# Altium PCB Grantv3.PcbDoc (part 3 of 5)
Units mil, origin at the board's own origin, x right, y up, seen from the top; angles counter-clockwise.
Board outline 3031.03 x 2829.03 mil, 2 copper layers (Top Layer, Bottom Layer); 187 components, 111 nets, 634 pads, 178 vias.
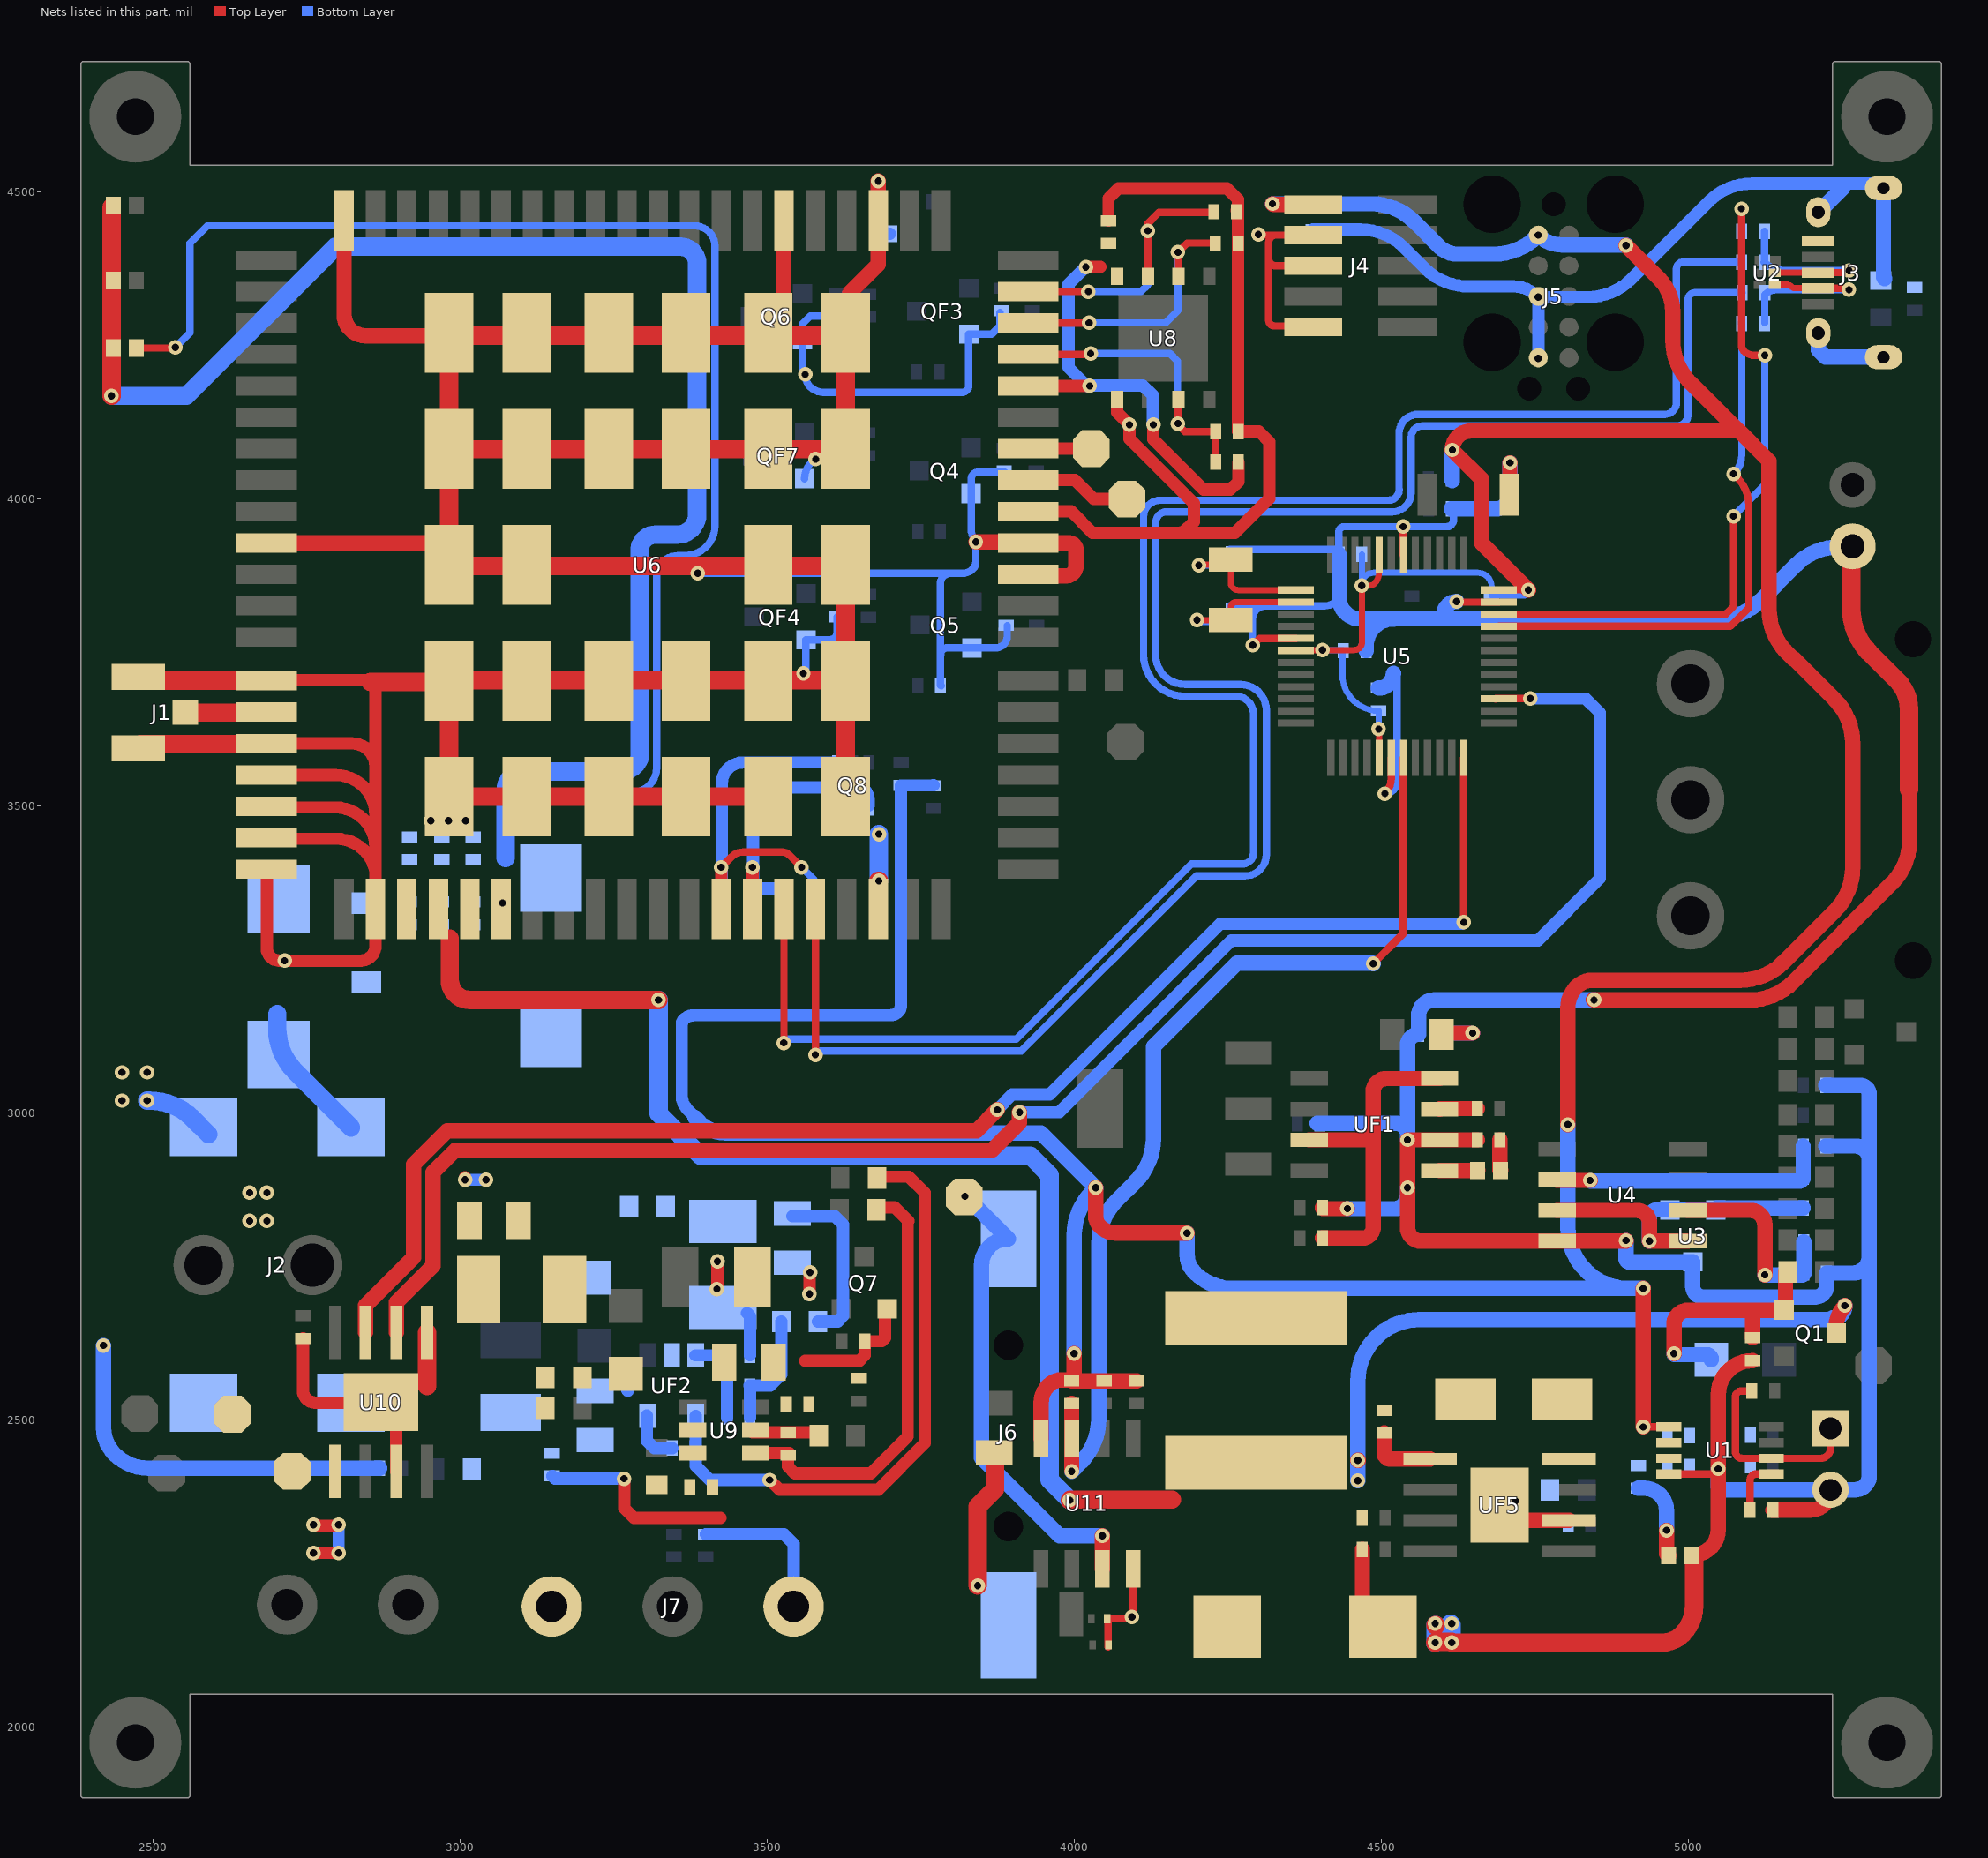
[diagram p2: the nets of this part, all layers, seen from the top]

## Part data (continued)
R28: library part RK73H1ETTP4992F, "RES 49.9K OHM 1% 1/10W 0402", Case/Package=0402, Case Code (Metric)=1005, MANUFACTURER="KOA Speer", Max Operating Temperature=155°C, Min Operating Temperature=-55°C, Package Quantity=10000, Power Rating=63mW, Resistance=49.9kR, Supplier Part Number 1=2019-RK73H1ETTP4992FCT-ND, Temperature Coefficient=100ppm/°C, Tolerance=1%, Voltage Rating=50V, Case Code (Imperial)=0402, ComponentLink1Description=http://www.jameco.com/Jameco/Products/ProdDS/1883861.pdf?src-supplier=Jameco, ComponentLink1URL=http://www.jameco.com/Jameco/Products/ProdDS/1883861.pdf?src-supplier=Jameco, ComponentLink2Description=http://components.arrow.com/part/dataview/39721535S7077293N5146?src-supplier=Arrow, ComponentLink2URL=http://components.arrow.com/part/dataview/39721535S7077293N5146?src-supplier=Arrow, ComponentLink3Description=http://www.koaspeer.com/catimages/Products/RK73H/RK73H.pdf?src-supplier=Mouser, ComponentLink3URL=http://www.koaspeer.com/catimages/Products/RK73H/RK73H.pdf?src-supplier=Mouser, Composition="Thick Film", Depth=0.5mm, Height=0.35mm, Lead Free="Lead Free", Length=1mm, Manufacturer Part Number=RK73H1ETTP4992F, Military Standard=Not, Packaging="Tape and Reel", Pricing 1="1=0.1, 10=0.024, 100=0.0097, 1000=0.00437, 2500=0.0038, 5000=0.00314 (USD)", Stock 1=158829, Supplier 1=Digi-Key, Termination=SMD/SMT, Voltage Rating (DC)=50V, Width=0.5mm, Working Voltage=50V
R101 RP4: library part RTT024022FTH, "40.2K ±1% 1/16W ±100ppm/°C 0402 Chip Resistor - Surface Mount RoHS", MANUFACTURER=RALEC, Package=0402, Manufacturer Part No=RTT024022FTH
RF1: library part 0805W4F680MT5E, "0.068 ±1% 1/4W ±800ppm/°C 0805 Chip Resistor - Surface Mount RoHS", MANUFACTURER="UNI-ROYAL(Uniroyal Elec)", Package=0805, Manufacturer Part No=0805W4F680MT5E
RF2: library part ERJ-2GEJ102X, "RES SMD 1K OHM 5% 1/10W 0402", Case/Package=0402, Case Code (Metric)=1005, MANUFACTURER=Panasonic, Max Operating Temperature=155°C, Max Power Dissipation=100mW, Min Operating Temperature=-55°C, Package Quantity=1, Resistance=1kR, Supplier Part Number 1=P1.0KJCT-ND, Temperature Coefficient=200ppm/°C, Tolerance=5%, Voltage Rating=50V, Case Code (Imperial)=0402, ComponentLink1Description=https://industrial.panasonic.com/cdbs/www-data/pdf/RDA0000/AOA0000C301.pdf?src-supplier=Future+Electronics, ComponentLink1URL=https://industrial.panasonic.com/cdbs/www-data/pdf/RDA0000/AOA0000C301.pdf?src-supplier=Future+Electronics, ComponentLink2Description=http://www.jameco.com/Jameco/Products/ProdDS/1986781.pdf?src-supplier=Jameco, ComponentLink2URL=http://www.jameco.com/Jameco/Products/ProdDS/1986781.pdf?src-supplier=Jameco, ComponentLink3Description=http://www.farnell.com/datasheets/2059623.pdf?src-supplier=Farnell, ComponentLink3URL=http://www.farnell.com/datasheets/2059623.pdf?src-supplier=Farnell, ComponentLink4Description=http://industrial.panasonic.com/www-data/pdf/AOA0000/AOA0000CE1.pdf?src-supplier=Avnet, ComponentLink4URL=http://industrial.panasonic.com/www-data/pdf/AOA0000/AOA0000CE1.pdf?src-supplier=Avnet, ComponentLink5Description=http://www.alliedelec.com/m/d/51cd0790071e1666bdb9d00c57fcf960.pdf?src-supplier=Allied+Electronics, ComponentLink5URL=http://www.alliedelec.com/m/d/51cd0790071e1666bdb9d00c57fcf960.pdf?src-supplier=Allied+Electronics, ComponentLink6Description=http://industrial.panasonic.com/www-data/pdf/AOA0000/AOA0000CE1.pdf?src-supplier=Avnet+Europe, ComponentLink6URL=http://industrial.panasonic.com/www-data/pdf/AOA0000/AOA0000CE1.pdf?src-supplier=Avnet+Europe, ComponentLink7Description=http://www.farnell.com/datasheets/2059623.pdf?src-supplier=Element14, ComponentLink7URL=http://www.farnell.com/datasheets/2059623.pdf?src-supplier=Element14, ComponentLink8Description=http://industrial.panasonic.com/cdbs/www-data/pdf/RDA0000/AOA0000C301.pdf?src-supplier=Farnell, ComponentLink8URL=http://industrial.panasonic.com/cdbs/www-data/pdf/RDA0000/AOA0000C301.pdf?src-supplier=Farnell, ComponentLink9Description=http://industrial.panasonic.com/www-data/pdf/AOA0000/AOA0000CE1.pdf?src-supplier=Avnet+Asia, ComponentLink9URL=http://industrial.panasonic.com/www-data/pdf/AOA0000/AOA0000CE1.pdf?src-supplier=Avnet+Asia, Composition="Thick Film", Contact Plating=Tin, Depth=0.5mm, Features="Automotive AEC-Q200", Height=0.35mm, Lead Free="Lead Free", Length=1mm, Manufacturer Part Number=ERJ-2GEJ102X, Military Standard=Not, Mount="Surface Mount", Number of Terminations=2, Packaging="Tape and Reel", Power Rating=100mW, Pricing 1="1=0.1, 10=0.032, 100=0.0129, 1000=0.00578, 2500=0.00502, 5000=0.00414 (USD)", Radiation Hardening=No, REACH SVHC="No SVHC", Stock 1=3855795, Supplier 1=Digi-Key, Termination=SMD/SMT, Voltage Rating (DC)=50V, Width=0.02inch, Working Voltage=50V
RF3 RF4: library part RC0402FR-071ML, "RES SMD 1M OHM 1% 1/16W 0402", Case/Package=0402, Case Code (Metric)=1005, MANUFACTURER=Yageo, Max Operating Temperature=155°C, Min Operating Temperature=-55°C, Power Rating=63mW, Resistance=1MR, Supplier Part Number 1=311-1.00MLRCT-ND, Temperature Coefficient=100ppm/°C, Tolerance=1%, Voltage Rating=50V, Case Code (Imperial)=0402, ComponentLink1Description=http://www.farnell.com/datasheets/1018594.pdf?src-supplier=Element14, ComponentLink1URL=http://www.farnell.com/datasheets/1018594.pdf?src-supplier=Element14, ComponentLink2Description=http://www.yageo.com/documents/recent/PYu-RC0402_51_RoHS_L_6_r.pdf?src-supplier=Future+Electronics, ComponentLink2URL=http://www.yageo.com/documents/recent/PYu-RC0402_51_RoHS_L_6_r.pdf?src-supplier=Future+Electronics, ComponentLink3Description=http://www.farnell.com/datasheets/2167052.pdf?src-supplier=Element14, ComponentLink3URL=http://www.farnell.com/datasheets/2167052.pdf?src-supplier=Element14, Composition="Thick Film", Depth=0.5mm, Height=0.32mm, Lead Free="Lead Free", Length=1mm, Manufacturer Part Number=RC0402FR-071ML, Military Standard=Not, Packaging="Tape and Reel", Pricing 1="1=0.1, 10=0.016, 100=0.0064, 1000=0.00289, 2500=0.00251, 5000=0.00207 (USD)", REACH SVHC=Unknown, Stock 1=3330803, Supplier 1=Digi-Key, Termination=SMD/SMT
RF16: library part RC0402FR-0713K3L, "RES SMD 13.3K OHM 1% 1/16W 0402", Case/Package=0402, Case Code (Metric)=1005, MANUFACTURER=Yageo, Max Operating Temperature=155°C, Max Power Dissipation=63mW, Min Operating Temperature=-55°C, Power Rating=62.5mW, Resistance=13.3kR, Supplier Part Number 1=YAG2974CT-ND, Temperature Coefficient=100ppm/°C, Tolerance=1%, Voltage Rating=50V, Case Code (Imperial)=0402, ComponentLink1Description=http://www.yageo.com/documents/recent/PYu-RC0402_51_RoHS_L_6.pdf?src-supplier=Avnet+Europe, ComponentLink1URL=http://www.yageo.com/documents/recent/PYu-RC0402_51_RoHS_L_6.pdf?src-supplier=Avnet+Europe, ComponentLink2Description=http://www.yageo.com/documents/recent/PYu-RC0402_51_RoHS_L_6_r.pdf?src-supplier=Future+Electronics, ComponentLink2URL=http://www.yageo.com/documents/recent/PYu-RC0402_51_RoHS_L_6_r.pdf?src-supplier=Future+Electronics, ComponentLink3Description=http://www.mouser.com/ds/2/447/PYu-RC0402_51_RoHS_L_6_r-8721.pdf?src-supplier=Mouser, ComponentLink3URL=http://www.mouser.com/ds/2/447/PYu-RC0402_51_RoHS_L_6_r-8721.pdf?src-supplier=Mouser, Composition="Thick Film", Contact Plating=Tin,Matte, Depth=0.5mm, Features="Moisture Resistant", Height=0.016inch, Lead Free="Lead Free", Length=1mm, Manufacturer Part Number=RC0402FR-0713K3L, Military Standard=Not, Number of Terminations=2, Packaging="Tape and Reel", Pricing 1="1=0.1, 10=0.016, 100=0.0064, 1000=0.00289, 2500=0.00251, 5000=0.00207 (USD)", Stock 1=459115, Supplier 1=Digi-Key, Termination=SMD/SMT, Voltage Rating (DC)=50V, Width=0.02inch, Working Voltage=50V
RF21 RF22 RF23 RF24: library part RC0402JR-070RL, "RES SMD 0 OHM JUMPER 1/16W 0402", Case/Package=0402, Case Code (Metric)=1005, MANUFACTURER=Yageo, Manufacturer Part Number=RC0402FR-070RL, Max Operating Temperature=155°C, Min Operating Temperature=-55°C, Power Rating=62.5mW, Resistance=0mR, Supplier Part Number 1=311-0.0LRCT-ND, Temperature Coefficient=200ppm/°C, Tolerance=1%, Voltage Rating=50V, Case Code (Imperial)=0402, ComponentLink1Description=http://www.yageo.com/documents/recent/PYu-RC0402_51_RoHS_L_6.pdf?src-supplier=Avnet, ComponentLink1URL=http://www.yageo.com/documents/recent/PYu-RC0402_51_RoHS_L_6.pdf?src-supplier=Avnet, ComponentLink2Description=http://www.yageo.com/documents/recent/PYu-RC0402_51_RoHS_L_6_r.pdf?src-supplier=Future+Electronics, ComponentLink2URL=http://www.yageo.com/documents/recent/PYu-RC0402_51_RoHS_L_6_r.pdf?src-supplier=Future+Electronics, ComponentLink3Description=http://www.yageo.com/documents/recent/PYu-RC0402_51_RoHS_L_6.pdf?src-supplier=Avnet+Europe, ComponentLink3URL=http://www.yageo.com/documents/recent/PYu-RC0402_51_RoHS_L_6.pdf?src-supplier=Avnet+Europe, Composition="Thick Film", Contact Plating=Tin,Matte, Height=0.35mm, Lead Free="Lead Free", Length=1mm, Mount="Surface Mount", Packaging="Tape and Reel", Pricing 1="1=0.1, 10=0.013, 25=0.0092, 50=0.0072, 100=0.0053, 250=0.004, 500=0.0032, 1000=0.00236, 5000=0.00169 (USD)", Radiation Hardening=No, Stock 1=3681314, Supplier 1=Digi-Key, Termination=SMD/SMT, Width=0.5mm
RF31: library part AC0402FR-07118KL, "RES SMD 118K OHM 1% 1/16W 0402", Case/Package=0402, MANUFACTURER=Yageo, Max Operating Temperature=155°C, Max Power Dissipation=63mW, Min Operating Temperature=-55°C, Resistance=118kR, Supplier Part Number 1=AC0402FR-07118KL-ND, Temperature Coefficient=100ppm/°C, Tolerance=1%, ComponentLink1Description=http://www.yageo.com/NewPortal/yageodocoutput?fileName=/pdf/R-Chip/PYu-AC_51_RoHS_L_6.pdf&src-supplier=Digi-Key, ComponentLink1URL=http://www.yageo.com/NewPortal/yageodocoutput?fileName=/pdf/R-Chip/PYu-AC_51_RoHS_L_6.pdf&src-supplier=Digi-Key, Composition="Thick Film", Features="Moisture Resistant,Automotive AEC-Q200", Height=0.015inch, Length=0.039inch, Manufacturer Part Number=AC0402FR-07118KL, Number of Terminations=2, Packaging="Tape and Reel", Pricing 1="10000=0.0022 (USD)", Stock 1=0, Supplier 1=Digi-Key, Width=0.02inch
RP1: library part RC0402FR-0760K4L, "RES SMD 60.4K OHM 1% 1/16W 0402", Case/Package=0402, Case Code (Metric)=1005, MANUFACTURER=Yageo, Max Operating Temperature=155°C, Min Operating Temperature=-55°C, Power Rating=62.5mW, Resistance=60.4kR, Supplier Part Number 1=311-60.4KLRCT-ND, Temperature Coefficient=100ppm/°C, Tolerance=1%, Voltage Rating=50V, Case Code (Imperial)=0402, ComponentLink1Description=http://www.yageo.com/documents/recent/PYu-RC0402_51_RoHS_L_6_r.pdf?src-supplier=Future+Electronics, ComponentLink1URL=http://www.yageo.com/documents/recent/PYu-RC0402_51_RoHS_L_6_r.pdf?src-supplier=Future+Electronics, ComponentLink2Description=http://www.yageo.com/documents/recent/PYu-RC0402_51_RoHS_L_6.pdf?src-supplier=Avnet+Europe, ComponentLink2URL=http://www.yageo.com/documents/recent/PYu-RC0402_51_RoHS_L_6.pdf?src-supplier=Avnet+Europe, ComponentLink3Description=http://www.yageo.com/documents/recent/PYu-RC0402_51_RoHS_L_6.pdf?src-supplier=Avnet, ComponentLink3URL=http://www.yageo.com/documents/recent/PYu-RC0402_51_RoHS_L_6.pdf?src-supplier=Avnet, Composition="Thick Film", Contact Plating=Tin,Matte, Depth=0.5mm, Lead Free="Lead Free", Length=1mm, Manufacturer Part Number=RC0402FR-0760K4L, Military Standard=Not, Packaging="Tape and Reel", Pricing 1="1=0.1, 10=0.016, 100=0.0064, 1000=0.00289, 2500=0.00251, 5000=0.00207 (USD)", Stock 1=533368, Supplier 1=Digi-Key, Termination=SMD/SMT, Voltage Rating (DC)=50V, Width=500um
RP3: library part AC0402FR-0762KL, "RES SMD 62K OHM 1% 1/16W 0402", Case/Package=0402, MANUFACTURER=Yageo, Max Operating Temperature=155°C, Max Power Dissipation=63mW, Min Operating Temperature=-55°C, Resistance=62kR, Supplier Part Number 1=AC0402FR-0762KL-ND, Temperature Coefficient=100ppm/°C, Tolerance=1%, ComponentLink1Description=http://www.yageo.com/documents/recent/PYu-AC_51_RoHS_L_2_revised.pdf?src-supplier=Future+Electronics, ComponentLink1URL=http://www.yageo.com/documents/recent/PYu-AC_51_RoHS_L_2_revised.pdf?src-supplier=Future+Electronics, ComponentLink2Description=http://www.yageo.com/NewPortal/yageodocoutput?fileName=/pdf/R-Chip/PYu-AC_51_RoHS_L_6.pdf&src-supplier=Digi-Key, ComponentLink2URL=http://www.yageo.com/NewPortal/yageodocoutput?fileName=/pdf/R-Chip/PYu-AC_51_RoHS_L_6.pdf&src-supplier=Digi-Key, Composition="Thick Film", Features="Moisture Resistant,Automotive AEC-Q200", Height=0.015inch, Lead Free="Lead Free", Length=0.039inch, Manufacturer Part Number=AC0402FR-0762KL, Number of Terminations=2, Packaging="Tape and Reel", Power Rating=63mW, Pricing 1="10000=0.0022 (USD)", Stock 1=0, Supplier 1=Digi-Key, Width=0.02inch
S1: "SPDT 5A 120V On-On DIP Toggle Switches RoHS", MANUFACTURER="XKB Enterprise", Package=Custom, Manufacturer Part No=SS-12D11L5
SB1 SB2 SB4 SB5 SB6 SB11 SB11x SB12 SB13 SB14 SB15 SB16 SB17 SB18 SB19 SB20 SB_AD SB_ZD: "Solder Bridge ON"
SW1: "SWITCH TACTILE SPST-NO 0.05A 12V", Contact Current Rating=50mA, Contact Resistance=100mR, Insulation Resistance=100MR, MANUFACTURER=Omron, Max Operating Temperature=70°C, Max Voltage Rating (DC)=12V, Min Operating Temperature=-25°C, Operating Force=1.5N, Package Quantity=1, Ratings="Dust Proof,IP40", Supplier Part Number 1=SW1020DKR-ND, Actuator Length=0.4mm, Actuator Type=Standard, ComponentLink1Description=http://www.farnell.com/datasheets/60838.pdf?src-supplier=Farnell, ComponentLink1URL=http://www.farnell.com/datasheets/60838.pdf?src-supplier=Farnell, ComponentLink2Description=http://www.farnell.com/datasheets/60838.pdf?src-supplier=Element14, ComponentLink2URL=http://www.farnell.com/datasheets/60838.pdf?src-supplier=Element14, ComponentLink3Description=https://omronfs.omron.com/en_US/ecb/products/pdf/en-b3u.pdf?src-supplier=Digi-Key, ComponentLink3URL=https://omronfs.omron.com/en_US/ecb/products/pdf/en-b3u.pdf?src-supplier=Digi-Key, ComponentLink4Description=http://www.omron.com/ecb/products/pdf/en-b3u.pdf?src-supplier=Digi-Key, ComponentLink4URL=http://www.omron.com/ecb/products/pdf/en-b3u.pdf?src-supplier=Digi-Key, ComponentLink5Description=https://www.distrelec.biz/Web/Downloads/he/et/B3U_eng_datasheet.pdf?mime=application%2Fpdf&src-supplier=Distrelec, ComponentLink5URL=https://www.distrelec.biz/Web/Downloads/he/et/B3U_eng_datasheet.pdf?mime=application%2Fpdf&src-supplier=Distrelec, ComponentLink6Description=http://www.onlinecomponents.com/productFiles/mf-OM/en-b3u.pdf?src-supplier=Onlinecomponents.com, ComponentLink6URL=http://www.onlinecomponents.com/productFiles/mf-OM/en-b3u.pdf?src-supplier=Onlinecomponents.com, ComponentLink7Description=https://www.verical.com/server-webapp/html/getDatasheet?partID=552554&src-supplier=Verical, ComponentLink7URL=https://www.verical.com/server-webapp/html/getDatasheet?partID=552554&src-supplier=Verical, ComponentLink8Description=http://www.farnell.com/datasheets/1685550.pdf?src-supplier=Element14, ComponentLink8URL=http://www.farnell.com/datasheets/1685550.pdf?src-supplier=Element14, ComponentLink9Description=http://www.farnell.com/datasheets/2610940.pdf?src-supplier=Farnell, ComponentLink9URL=http://www.farnell.com/datasheets/2610940.pdf?src-supplier=Farnell, ComponentLink10Description=https://www.alliedelec.com/m/d/4c8a9ef82804fc3c241a13c1e298fd73.pdf?src-supplier=Allied+Electronics, ComponentLink10URL=https://www.alliedelec.com/m/d/4c8a9ef82804fc3c241a13c1e298fd73.pdf?src-supplier=Allied+Electronics, Contact Material=Silver, Current Rating=50mA, Depth=2.5mm, Electrical Life=200000Cycles, Height=1.2mm, Illumination Type=Non-Illuminated,Illuminated, Lead Free="Lead Free", Length=4mm, Manufacturer Part Number=B3U-1000P, Max Current Rating=50mA, Mechanical Life=200000Cycles, Mount="Surface Mount", Orientation=Straight, Packaging="Tape and Reel", Pricing 1="1=1, 10=0.961, 25=0.9064, 50=0.7976, 100=0.7251, 250=0.68888, 500=0.67074, 1000=0.52571 (USD)", REACH SVHC=Unknown, Stock 1=116454, Supplier 1=Digi-Key, Switch Function=Off-Mom, Switch Travel=0.15mm, Termination=SMD/SMT, Throw Configuration=SPST, Voltage Rating (DC)=12V, Weight=0.000776oz, Width=3mm
U1: "IC REG LINEAR 3.3V 500MA MICRO8", Case/Package=MSOP, Dropout Voltage=340mV, MANUFACTURER="ON Semiconductor", Max Input Voltage=16V, Max Operating Temperature=150°C, Max Output Current=800mA, Min Input Voltage=2.6V, Min Operating Temperature=-40°C, Min Output Voltage=3.3V, Output Voltage Accuracy=0.9%, Package Quantity=4000, Reference Voltage=1.269V, Supplier Part Number 1=NCP3335ADM330R2GOSCT-ND, Accuracy=0.9%, ComponentLink1Description=http://www.onsemi.com/pub_link/Collateral/NCP3335A-D.PDF?src-supplier=Future+Electronics, ComponentLink1URL=http://www.onsemi.com/pub_link/Collateral/NCP3335A-D.PDF?src-supplier=Future+Electronics, ComponentLink2Description=http://www.onsemi.com/pub/Collateral/NCP3335A-D.PDF?src-supplier=Digi-Key, ComponentLink2URL=http://www.onsemi.com/pub/Collateral/NCP3335A-D.PDF?src-supplier=Digi-Key, Halogen Free="Halogen Free", Height=0.95mm, Lead Free="Lead Free", Length=3.1mm, Manufacturer Part Number=NCP3335ADM330R2G, Mount="Surface Mount", Number of Outputs=1, Number of Pins=8, Number of Regulators=1, Output Current=800mA, Output Type=Fixed, Output Voltage=3.3V, Packaging="Tape and Reel", Polarity=Positive, Pricing 1="1=1.12, 10=1.003, 25=0.952, 100=0.731, 250=0.646, 500=0.612, 1000=0.476 (USD)", Radiation Hardening=No, Stock 1=2299, Supplier 1=Digi-Key, Width=3.1mm
U2: "TVS DIODE 5V 6.8V 6UDFN", Capacitance=1E-12F, Clamping Voltage=6.8V, MANUFACTURER=Littelfuse, Max Operating Temperature=125°C, Max Surge Current=8A, Min Operating Temperature=-40°C, Package Quantity=3000, Power Line Protection=Yes, Reverse Standoff Voltage=5V, Supplier Part Number 1=F6501DKR-ND, ComponentLink1Description=http://www.mouser.com/ds/2/240/Littelfuse_TVS_Diode_Array_SP3014_Datasheet.pdf-364113.pdf?src-supplier=Mouser, ComponentLink1URL=http://www.mouser.com/ds/2/240/Littelfuse_TVS_Diode_Array_SP3014_Datasheet.pdf-364113.pdf?src-supplier=Mouser, ComponentLink2Description=https://www.littelfuse.com/~/media/electronics/datasheets/tvs_diode_arrays/littelfuse_tvs_diode_array_sp3014_datasheet.pdf.pdf?src-supplier=Digi-Key, ComponentLink2URL=https://www.littelfuse.com/~/media/electronics/datasheets/tvs_diode_arrays/littelfuse_tvs_diode_array_sp3014_datasheet.pdf.pdf?src-supplier=Digi-Key, ComponentLink3Description=http://www.littelfuse.com/~/media/electronics/datasheets/tvs_diode_arrays/littelfuse_tvs_diode_array_sp3014_datasheet.pdf.pdf?src-supplier=Digi-Key, ComponentLink3URL=http://www.littelfuse.com/~/media/electronics/datasheets/tvs_diode_arrays/littelfuse_tvs_diode_array_sp3014_datasheet.pdf.pdf?src-supplier=Digi-Key, ComponentLink4Description=http://www.farnell.com/datasheets/2291833.pdf?src-supplier=Element14, ComponentLink4URL=http://www.farnell.com/datasheets/2291833.pdf?src-supplier=Element14, ComponentLink5Description=http://www.farnell.com/datasheets/2291833.pdf?src-supplier=Farnell, ComponentLink5URL=http://www.farnell.com/datasheets/2291833.pdf?src-supplier=Farnell, ComponentLink6Description=http://www.farnell.com/datasheets/2291833.pdf?src-supplier=Newark, ComponentLink6URL=http://www.farnell.com/datasheets/2291833.pdf?src-supplier=Newark, Height=0.55mm, Length=1.65mm, Manufacturer Part Number=SP3014-02UTG, Mount="Surface Mount", Number of Bidirectional Channels=2, Number of Channels=2, Number of Pins=6, Packaging="Tape and Reel", Peak Pulse Current=8A, Polarity=Unidirectional, Pricing 1="1=0.56, 10=0.495, 25=0.4652, 100=0.3375, 250=0.32552, 500=0.282, 1000=0.24 (USD)", Stock 1=3888, Supplier 1=Digi-Key, Termination=SMD/SMT, Width=1.05mm, Working Voltage=5V
U3: "IC VREF SHUNT 18V 0.5% SOT23", Case/Package=SOT-23, Cathode Current=100uA, MANUFACTURER="Diodes Zetex", Max Input Voltage=20V, Max Operating Temperature=125°C, Max Output Current=15mA, Max Output Voltage=18V, Min Operating Temperature=-40°C, Min Output Voltage=1.24V, Package Quantity=1, Supplier Part Number 1=TLV431BFCT-ND, Tolerance=0.5%, ComponentLink1Description=https://www.diodes.com/assets/Datasheets/TLV431.pdf?src-supplier=Digi-Key, ComponentLink1URL=https://www.diodes.com/assets/Datasheets/TLV431.pdf?src-supplier=Digi-Key, ComponentLink2Description=http://www.farnell.com/datasheets/1904413.pdf?src-supplier=Element14, ComponentLink2URL=http://www.farnell.com/datasheets/1904413.pdf?src-supplier=Element14, ComponentLink3Description=http://www.farnell.com/datasheets/2100168.pdf?src-supplier=Element14, ComponentLink3URL=http://www.farnell.com/datasheets/2100168.pdf?src-supplier=Element14, ComponentLink4Description=http://www.diodes.com/datasheets/TLV431.pdf?src-supplier=Future+Electronics, ComponentLink4URL=http://www.diodes.com/datasheets/TLV431.pdf?src-supplier=Future+Electronics, Height=1.02mm, Lead Free="Lead Free", Length=3.04mm, Manufacturer Part Number=TLV431BFTA, Mount="Surface Mount", Number of Pins=3, Output Current=15mA, Output Type=Adjustable, Output Voltage=18V, Packaging="Tape and Reel", Pricing 1="1=0.49, 10=0.417, 25=0.3888, 100=0.2889, 250=0.24444, 500=0.23332, 1000=0.17221 (USD)", Radiation Hardening=No, REACH SVHC="No SVHC", Reference Type=Shunt,Adjustable, Reference Voltage=18V, Stock 1=51651, Supplier 1=Digi-Key, Width=1.4mm
U4: "IC COMPARATOR LP DUAL 8-SOIC", Case/Package=SO, Dual Supply Voltage=9V, Input Bias Current=250nA, Input Offset Voltage (Vos)=5mV, MANUFACTURER=STMicroelectronics, Max Dual Supply Voltage=18V, Max Operating Temperature=70°C, Max Power Dissipation=710mW, Max Supply Current=1mA, Max Supply Voltage=36V, Min Dual Supply Voltage=1V, Min Operating Temperature=0°C, Min Supply Voltage=2V, Natural Thermal Resistance=125°C/W, Operating Supply Voltage=28V, Output Current=18mA, Output Current per Channel=100pA, Package Quantity=2500, Quiescent Current=2.5mA, Supplier Part Number 1=497-1593-1-ND, Voltage Gain=106.02dB, ComponentLink1Description=http://www.st.com/content/ccc/resource/technical/document/datasheet/group1/b4/cc/cf/13/18/28/44/f5/CD00000465/files/CD00000465.pdf/jcr:content/translations/en.CD00000465.pdf?src-supplier=Digi-Key, ComponentLink1URL=http://www.st.com/content/ccc/resource/technical/document/datasheet/group1/b4/cc/cf/13/18/28/44/f5/CD00000465/files/CD00000465.pdf/jcr:content/translations/en.CD00000465.pdf?src-supplier=Digi-Key, ComponentLink2Description=https://www.verical.com/server-webapp/html/getDatasheet?partID=302604&src-supplier=Verical, ComponentLink2URL=https://www.verical.com/server-webapp/html/getDatasheet?partID=302604&src-supplier=Verical, ComponentLink3Description=http://www.st.com/st-web-ui/static/active/en/resource/technical/document/datasheet/CD00000465.pdf?src-supplier=Avnet, ComponentLink3URL=http://www.st.com/st-web-ui/static/active/en/resource/technical/document/datasheet/CD00000465.pdf?src-supplier=Avnet, ComponentLink4Description=http://www.mouser.com/ds/2/389/lm193-955038.pdf?src-supplier=Mouser, ComponentLink4URL=http://www.mouser.com/ds/2/389/lm193-955038.pdf?src-supplier=Mouser, ComponentLink5Description=http://www.farnell.com/datasheets/2291162.pdf?src-supplier=Element14, ComponentLink5URL=http://www.farnell.com/datasheets/2291162.pdf?src-supplier=Element14, ComponentLink6Description=https://www.distrelec.biz/Web/Downloads/_e/ng/LM393_ST_tds_eng.pdf?mime=application%2Fpdf&src-supplier=Distrelec, ComponentLink6URL=https://www.distrelec.biz/Web/Downloads/_e/ng/LM393_ST_tds_eng.pdf?mime=application%2Fpdf&src-supplier=Distrelec, ComponentLink7Description=http://www.st.com/web/en/resource/technical/document/datasheet/CD00000465.pdf?src-supplier=Future+Electronics, ComponentLink7URL=http://www.st.com/web/en/resource/technical/document/datasheet/CD00000465.pdf?src-supplier=Future+Electronics, ComponentLink8Description=http://datasheet.iiic.cc/stmicroelectronics/LM393DT.pdf?src-supplier=IIIC, ComponentLink8URL=http://datasheet.iiic.cc/stmicroelectronics/LM393DT.pdf?src-supplier=IIIC, Contact Plating=Gold, Height=1.25mm, Lead Free="Lead Free", Length=4.9mm, Manufacturer Part Number=LM393DT, Max Input Current=250nA, Mount="Surface Mount", Nominal Supply Current=1mA, Number of Channels=2, Number of Elements=2, Number of Pins=8, Output Type=TTL, Packaging="Tape and Reel", Pricing 1="1=0.48, 10=0.358, 25=0.3136, 100=0.1792, 250=0.168, 500=0.1344, 1000=0.10304 (USD)", Propagation Delay=1.3us, Radiation Hardening=No, REACH SVHC="No SVHC", Response Time=1.3us, Stock 1=46251, Supplier 1=Digi-Key, Turn-On Delay Time=1.3us, Type="General Purpose", Weight=0.01lb, Width=3.9mm
U5: "IC MCU 32BIT 256KB FLASH 48TQFP", MANUFACTURER=Microchip, Manufacturer Part Number=ATSAMD21G18A-AUT, Supplier Part Number 1=ATSAMD21G18A-AUTDKR-ND, ComponentLink1Description=http://www.microchip.com/mymicrochip/filehandler.aspx?ddocname=en590210, ComponentLink1URL=http://www.microchip.com/mymicrochip/filehandler.aspx?ddocname=en590210, Pricing 1="1=3.32, 25=3.0104, 100=2.7348 (USD)", Stock 1=4547, Supplier 1=Digi-Key
U6: "UMTS/HSPA+ Module", MANUFACTURER=Quectel, Package=Custom, Manufacturer Part No=UC200T
U8: "GLOBAL IOT EMBEDDED SIM CHIP", MANUFACTURER=Hologram, Supplier Part Number 1=1887-1002-1-ND, ComponentLink1Description=https://media.digikey.com/pdf/Data%20Sheets/Hologram%20PDFs/SIM_DS_170107_v2.pdf?src-supplier=Digi-Key, ComponentLink1URL=https://media.digikey.com/pdf/Data%20Sheets/Hologram%20PDFs/SIM_DS_170107_v2.pdf?src-supplier=Digi-Key, Manufacturer Part Number=SIM-ST-MFF2, Pricing 1="1=6.3, 100=5.985 (USD)", Stock 1=0, Supplier 1=Digi-Key
U9: "Step-Up Positive Adjustable 1 2A 1.2MHz SOT-23-6 DC-DC Converters RoHS", MANUFACTURER="Axelite Tech", Package=SOT-23-6, Manufacturer Part No=AX5523CA
U10: "IC MOTOR DRVR UNIPLR 8SO PWRPAD", MANUFACTURER="Texas Instruments", Max Operating Temperature=125°C, Max Output Current=3.6A, Min Operating Temperature=-40°C, Supplier Part Number 1=296-43024-1-ND, ComponentLink1Description=http://www.ti.com/lit/pdf/slyb165?src-supplier=Digi-Key, ComponentLink1URL=http://www.ti.com/lit/pdf/slyb165?src-supplier=Digi-Key, ComponentLink2Description=http://www.ti.com/lit/ds/symlink/drv8871.pdf?src-supplier=Digi-Key, ComponentLink2URL=http://www.ti.com/lit/ds/symlink/drv8871.pdf?src-supplier=Digi-Key, Fault Protection="Over Temperature", Interface=PWM, Lead Free="Lead Free", Manufacturer Part Number=DRV8871DDAR, Mount="Surface Mount", Packaging="Tape and Reel", Pricing 1="1=2.51, 10=2.253, 25=2.1252, 100=1.7, 250=1.48752, 500=1.445, 1000=1.1475 (USD)", Stock 1=8562, Supplier 1=Digi-Key
U11: "IC RTC CLK/CALENDAR I2C 8-SOIC", Case/Package=SOIC, MANUFACTURER=Microchip, Max Frequency=400kHz, Max Operating Temperature=85°C, Max Supply Voltage=5.5V, Min Operating Temperature=-40°C, Min Supply Voltage=1.8V, Package Quantity=100, Supplier Part Number 1=MCP7940N-I/SN-ND, ComponentLink1Description=http://www.microchip.com/mymicrochip/filehandler.aspx?ddocname=en569228&src-supplier=Digi-Key, ComponentLink1URL=http://www.microchip.com/mymicrochip/filehandler.aspx?ddocname=en569228&src-supplier=Digi-Key, ComponentLink2Description=http://www.farnell.com/datasheets/2129560.pdf?src-supplier=Mouser, ComponentLink2URL=http://www.farnell.com/datasheets/2129560.pdf?src-supplier=Mouser, ComponentLink3Description=http://www.microchip.com/mymicrochip/filehandler.aspx?ddocname=en553487&src-supplier=Future+Electronics, ComponentLink3URL=http://www.microchip.com/mymicrochip/filehandler.aspx?ddocname=en553487&src-supplier=Future+Electronics, ComponentLink4Description=http://www.farnell.com/datasheets/2129560.pdf?src-supplier=Avnet+Europe, ComponentLink4URL=http://www.farnell.com/datasheets/2129560.pdf?src-supplier=Avnet+Europe, ComponentLink5Description=http://www.farnell.com/datasheets/2129560.pdf?src-supplier=Avnet, ComponentLink5URL=http://www.farnell.com/datasheets/2129560.pdf?src-supplier=Avnet, Contact Plating=Tin,Matte, Height=1.5mm, Interface=I2C, Lead Free="Lead Free", Length=4.9mm, Logic Function=Clock, Manufacturer Part Number=MCP7940N-I/SN, Memory Size=64B, Mount="Surface Mount", Number of Pins=8, Packaging=Rail/Tube, Pricing 1="1=0.74, 25=0.68, 100=0.65 (USD)", Radiation Hardening=No, REACH SVHC="No SVHC", Stock 1=4875, Supplier 1=Digi-Key, Time Format=HH:MM:SS, Width=3.9mm
UF1: "IC LI-ION LDO CHARGE MGMT 8SOIC", Battery Pack Voltage=8.4V, Case/Package=D, MANUFACTURER="Texas Instruments", Max Operating Temperature=70°C, Max Supply Voltage=15V, Min Input Voltage=4.5V, Min Operating Temperature=-20°C, Output Current=2A, Package Quantity=2500, Supplier Part Number 1=296-41202-1-ND, ComponentLink1Description=http://www.ti.com/lit/ds/symlink/bq2057c.pdf?src-supplier=Digi-Key, ComponentLink1URL=http://www.ti.com/lit/ds/symlink/bq2057c.pdf?src-supplier=Digi-Key, ComponentLink2Description=http://focus.ti.com/lit/ds/symlink/bq2057.pdf?src-supplier=Avnet+Europe, ComponentLink2URL=http://focus.ti.com/lit/ds/symlink/bq2057.pdf?src-supplier=Avnet+Europe, ComponentLink3Description=http://www.ti.com/general/docs/lit/getliterature.tsp?genericPartNumber=BQ2057W&&fileType=pdf&src-supplier=Avnet, ComponentLink3URL=http://www.ti.com/general/docs/lit/getliterature.tsp?genericPartNumber=BQ2057W&&fileType=pdf&src-supplier=Avnet, ComponentLink4Description=https://www.verical.com/server-webapp/html/getDatasheet?partID=613088&src-supplier=Verical, ComponentLink4URL=https://www.verical.com/server-webapp/html/getDatasheet?partID=613088&src-supplier=Verical, ComponentLink5Description=http://datasheet.iiic.cc/texas_instruments/BQ2057WSNTR.pdf?src-supplier=IIIC, ComponentLink5URL=http://datasheet.iiic.cc/texas_instruments/BQ2057WSNTR.pdf?src-supplier=IIIC, Contact Plating=Gold, Lead Free="Lead Free", Manufacturer Part Number=BQ2057WSNTR, Min Supply Voltage=4.5V, Number of Cells=2, Number of Pins=8, Output Voltage=8.4V, Packaging="Tape and Reel", Pricing 1="1=2.01, 10=1.802, 25=1.7, 100=1.36, 250=1.19, 500=1.156, 1000=0.918 (USD)", Radiation Hardening=No, Stock 1=9023, Supplier 1=Digi-Key, Weight=0.002677oz
UF2: "IC REG BOOST ADJ 2A SOT23-5", Case/Package=SOT-23-5, MANUFACTURER="TI National Semiconductor", Max Input Voltage=14V, Max Operating Temperature=125°C, Max Output Current=1.4A, Max Output Voltage=20V, Min Input Voltage=2.7V, Min Operating Temperature=-40°C, Min Output Voltage=3V, Package Quantity=1000, Quiescent Current=2mA, Supplier Part Number 1=LMR62014XMF/NOPBCT-ND, Switching Frequency=1.6MHz, ComponentLink1Description=http://www.ti.com/general/docs/lit/getliterature.tsp?genericPartNumber=LMR62014&&fileType=pdf&src-supplier=Avnet, ComponentLink1URL=http://www.ti.com/general/docs/lit/getliterature.tsp?genericPartNumber=LMR62014&&fileType=pdf&src-supplier=Avnet, ComponentLink2Description=http://www.ti.com/lit/gpn/lmr62014?src-supplier=Mouser, ComponentLink2URL=http://www.ti.com/lit/gpn/lmr62014?src-supplier=Mouser, ComponentLink3Description=http://www.farnell.com/datasheets/1882593.pdf?src-supplier=Element14, ComponentLink3URL=http://www.farnell.com/datasheets/1882593.pdf?src-supplier=Element14, ComponentLink4Description=http://www.ti.com/lit/ds/symlink/lmr62014.pdf?src-supplier=Digi-Key, ComponentLink4URL=http://www.ti.com/lit/ds/symlink/lmr62014.pdf?src-supplier=Digi-Key, Contact Plating=Tin,Matte, Lead Free="Lead Free", Manufacturer Part Number=LMR62014XMF/NOPB, Mount="Surface Mount", Number of Outputs=1, Number of Pins=5, Output Configuration=Positive, Output Current=1.4A, Output Type=Adjustable, Output Voltage=20V, Packaging="Tape and Reel", Pricing 1="1=1.6, 10=1.428, 25=1.3552, 100=1.0406, 250=0.9196, 500=0.8712 (USD)", Radiation Hardening=No, REACH SVHC="No SVHC", Stock 1=74950, Supplier 1=Digi-Key, Synchronous Rectifier=No, Topology=Boost
UF5: "IC REG BUCK ADJUSTABLE 3A 8SOPWR", MANUFACTURER="Texas Instruments", Max Input Voltage=36V, Max Operating Temperature=125°C, Max Output Current=3A, Max Output Voltage=31V, Min Input Voltage=5.5V, Min Operating Temperature=-40°C, Min Output Voltage=1.22V, Package Quantity=2500, Quiescent Current=3mA, Supplier Part Number 1=296-23177-1-ND, Switching Frequency=500kHz, ComponentLink1Description=http://www.ti.com/general/docs/lit/getliterature.tsp?genericPartNumber=TPS5430-Q1&&fileType=pdf&src-supplier=Avnet, ComponentLink1URL=http://www.ti.com/general/docs/lit/getliterature.tsp?genericPartNumber=TPS5430-Q1&&fileType=pdf&src-supplier=Avnet, ComponentLink2Description=http://focus.ti.com/lit/ds/symlink/tps5430-q1.pdf?src-supplier=Avnet+Europe, ComponentLink2URL=http://focus.ti.com/lit/ds/symlink/tps5430-q1.pdf?src-supplier=Avnet+Europe, ComponentLink3Description=http://www.ti.com/lit/ds/symlink/tps5430-q1.pdf?src-supplier=Digi-Key, ComponentLink3URL=http://www.ti.com/lit/ds/symlink/tps5430-q1.pdf?src-supplier=Digi-Key, ComponentLink4Description=http://www.farnell.com/datasheets/2019094.pdf?src-supplier=Element14, ComponentLink4URL=http://www.farnell.com/datasheets/2019094.pdf?src-supplier=Element14, ComponentLink5Description=http://www.ti.com/lit/gpn/tps5430-q1?src-supplier=Mouser, ComponentLink5URL=http://www.ti.com/lit/gpn/tps5430-q1?src-supplier=Mouser, ComponentLink6Description=http://datasheet.iiic.cc/texas_instruments/TPS5430QDDARQ1.pdf?src-supplier=IIIC, ComponentLink6URL=http://datasheet.iiic.cc/texas_instruments/TPS5430QDDARQ1.pdf?src-supplier=IIIC, Efficiency=95%, Lead Free="Lead Free", Manufacturer Part Number=TPS5430QDDARQ1, Mount="Surface Mount", Number of Outputs=1, Number of Pins=8, Operating Supply Voltage=36V, Output Current=3A, Output Type=Adjustable, Output Voltage=31V, Packaging="Tape and Reel", Pricing 1="1=4.81, 10=4.32, 25=4.0836, 100=3.3578, 250=3.01292, 500=2.904, 1000=2.41395 (USD)", Radiation Hardening=No, REACH SVHC="No SVHC", Stock 1=2547, Supplier 1=Digi-Key, Synchronous Rectifier=No, Weight=0.00249oz
X1 X3: "CRYSTAL 32.7680KHZ 12.5PF SMD", Case/Package=SMD/SMT, ESR (Equivalent Series Resistance)=70kR, Frequency=32.768kHz, Frequency Tolerance=20ppm, Load Capacitance=12.5pF, MANUFACTURER=NDK, Max Operating Temperature=85°C, Min Operating Temperature=-40°C, Package Quantity=1000, Supplier Part Number 1=644-1156-6-ND, ComponentLink1Description=https://media.digikey.com/pdf/Data%20Sheets/NDK%20PDFs/NX3215SA-32.768K-STD-MUA-8.pdf?src-supplier=Digi-Key, ComponentLink1URL=https://media.digikey.com/pdf/Data%20Sheets/NDK%20PDFs/NX3215SA-32.768K-STD-MUA-8.pdf?src-supplier=Digi-Key, ComponentLink2Description=http://www.ndk.com/images/products/catalog/c_NX3215SA-STD-MUA-14_e.pdf?src-supplier=Digi-Key, ComponentLink2URL=http://www.ndk.com/images/products/catalog/c_NX3215SA-STD-MUA-14_e.pdf?src-supplier=Digi-Key, Height=0.035inch, Lead Free="Lead Free", Length=0.126inch, Manufacturer Part Number=NX3215SA-32.768K-STD-MUA-8, Mount="Surface Mount", Number of Pins=2, Packaging="Tape and Reel", Pricing 1="1=0.68, 10=0.602, 50=0.5628, 100=0.4974, 500=0.47124, 1000=0.3927 (USD)", Stock 1=29951, Supplier 1=Digi-Key, Width=0.059inch

## Free pads (board coordinates)
  round 150 hole 60 square: MH4(2471,1974) MH4(2471,4623) MH4(5324,1974) MH4(5324,4623)

## Via types
v1: diameter 23.62, hole 11.81, Top Layer to Bottom Layer, 178 vias

## Nets (pads, with @x,y where several pads share a name; then routed paths per layer and width w, separated by ;. In a path a pad name is that pad's centre, name@x,y a point inside that pad or via, vN(x,y) a via of type N, cw(c..) or ccw(c..) an arc to the next point about the centre after c; other vN are vias at no path point)
3V3: C3.1 C4.1 C11.1 C12.1 C13.1 C14.1 C29.1 J4.1 J5.1 R1.2 R9.2 R23.2 R24.2 R25.2 RS2.1 RS4.1 U1.1 U1.2 U1.3 U5.6 U5.17 U5.36 U5.44 U11.8 | length 8145.7
  Top Layer w10: U5.6@4361,3753.32 4361,3754 v1(4404.5,3754) 4456,3754 ccw(c4456,3767) 4469,3767 v1@4469,3860 ; 4481.76,3859 ccw(c4481.76,3869.24) 4489,3862 ccw(c4470.1,3880.9) 4496.83,3880.9 U5.44@4496.83,3908.83 ; v1(4496,3625.17) cw(c4496.83,3625.17) 4496.83,3626 U5.17@4496.83,3578.12 ; U5.36@4691.71,3851.74 v1(4739.74,3851.74)
  Top Layer w12: v1(4927,2488.39) U1.1@4968.54,2488.39
  Top Layer w25: U11.8@3946,2470 3946,2527.03 cw(c3986.97,2527.03) 3958,2556 cw(c3979.73,2534.27) 3979.73,2565 R25.2@3996,2565 ; v1(4000,2608) 4000,2565 R25.2@3996,2565 ; v1(4035,2878) 4035,2831.9 ccw(c4058.9,2831.9) 4042,2815 ccw(c4068.56,2841.56) 4068.56,2804 v1(4184,2804) ; R23.2@4102,2563.5 R24.2@4049,2563.5 R25.2@3996,2563.5 R25.2@3996,2565 ; v1(4323,4481) ccw(c4325.41,4483.41) 4325.41,4480 J4.1@4389.46,4480 ; v1@4740,3852 4664,3928 4664,4032 v1(4616,4080) cw(c4647,4080) 4647,4111 5082,4111 ; v1(4804,2981) 4804,3170.47 cw(c4853.56,3170.47) 4818.52,3205.52 cw(c4843.83,3180.2) 4843.83,3216 5084.58,3216 ccw(c5084.58,3316) 5155.29,3245.29 5238.71,3328.71 ccw(c5168,3399.42) 5268,3399.42 5268,3602.58 ccw(c5168,3602.58) 5238.71,3673.29 5172.5,3739.5 ; v1(4899,4413) 4952.37,4359.63 cw(c4897.75,4305) 4975,4305 4975,4259.42 ccw(c5075,4259.42) 5004.29,4188.71 5082,4111 ; v1(4927,2488.39) v1(4927,2714) ; 5172,3739 5161.29,3749.71 cw(c5232,3820.42) 5153.35,3758.66 cw(c5232,3820.42) 5132,3820.42 5132,4062 5083,4111 5082,4111
  Bottom Layer w10: v1@4405,3754 4437,3754 4437,3714 ccw(c4496,3714) C12.1@4496,3655 v1(4496,3625.17) ; v1(4468.5,3859) v1@4468.5,3860 ; C14.1@4468.5,3910 4468.5,3864.44 cw(c4488,3860) 4488,3880 4657.34,3880 cw(c4657.34,3857.34) 4680,3857.34 C11.1@4680,3842.5 4730.5,3842.5 ccw(c4730.5,3851.74) v1(4739.74,3851.74)
  Bottom Layer w20: 3370,3006 cw(c3391.73,3027.73) 3361,3027.73 3361,3144.76 cw(c3371.24,3144.76) 3364,3152 cw(c3380.9,3135.1) 3380.9,3159 3701,3159 ccw(c3701,3176) 3718,3176 RS4.1@3718,3533.5 3769.79,3533.5 ccw(c3769.79,3535.21) RS2.1@3771,3534 ; 3371,3005 3383,2993
  Bottom Layer w25: 3382.4,2992.4 3390.69,2984.11 ccw(c3432,3025.42) 3432,2967 3946,2967 v1(4035,2878) ; v1(4000,2608) 4000,2800.58 cw(c4100,2800.58) 4029.29,2871.29 v1@4035,2877 ; v1(4184,2804) 4184,2768.97 ccw(c4224.97,2768.97) 4196,2740 ccw(c4258.77,2802.77) 4258.77,2714 4904,2714 ; v1(4323,4481) 4483.58,4481 cw(c4483.58,4381) 4554.29,4451.71 4594.98,4411.02 ccw(c4624,4440.04) 4624,4399 4683.58,4399 ccw(c4683.58,4499) 4754.29,4428.29 v1(4756,4430) ccw(c4795.23,4469.23) 4795.23,4413.75 v1@4899,4413.75 ; R9.2@4616,4030 v1(4616,4080) ; v1(4804,2981) 4804,2814 ccw(c4904,2814) 4904,2714 ; v1@4898.79,4412.79 v1(4899,4413) ; v1(4927,2714) 4904,2714
3V3AD: CC.1 CD.1 L1.1 RB1.2 SB5.2 U9.5 | length 115.7
  Top Layer w20: U9.5@3473,2483 3476.5,2479.5 RB1.2@3534,2479.5 3586.5,2479.5 SB5.2@3587,2479
3V3ZD: CE.1 CF.1 LZ.1 RZ.2 SB6.2 UF2.5 | length 87.5
  Bottom Layer w20: UF2.5@3304,2507 3304,2466 3316,2454 RZ.2@3345.5,2454
3V8: C19.1 C20.1 C21.1 C22.1 C23.1 C24.1 C25.1 C26.1 CF3.1 D2.2 L2.2 LED3.1 LED4.1 LEDF1.1 Q1.3 RF5.1 U6.57 U6.58 U6.59 U6.60 | length 5877.2
  Top Layer w25: v1(4462,2434) v1@4463,2434 ; Q1.3@5241.32,2641.01 5241.32,2651.98 cw(c5288.02,2651.98) v1@5255,2685 ; v1@5255.32,2685 v1(5255.32,2686)
  Top Layer w30: v1(2432,4168) LEDF1.1@2432,4475 ; 2983,3284 2983,3216.68 ccw(c3015.68,3216.68) 3015.68,3184 v1(3323,3184) ; v1(3993,2369) 3994,2370 4159,2370
  Bottom Layer w25: v1(4462,2401) v1(4462,2434) 4462,2563 ; 5235.32,2666 ccw(c5235.32,2686) v1@5255.02,2682.53 ; 4462,2563 cw(c4562,2563) 4463.52,2580.36 ; 4462,2563 4463.52,2580.36 ; 4463.52,2580.36 cw(c4562,2563) 4468.03,2597.2 ; 4463.52,2580.36 4468.03,2597.2 ; 4468.03,2597.2 cw(c4562,2563) 4475.4,2613 ; 4468.03,2597.2 4475.4,2613 ; 4475.4,2613 cw(c4562,2563) 4485.4,2627.28 ; 4475.4,2613 4485.4,2627.28 ; 4485.4,2627.28 cw(c4562,2563) 4497.72,2639.6 ; 4485.4,2627.28 4497.72,2639.6 ; 4497.72,2639.6 cw(c4562,2563) 4512,2649.6 ; 4497.72,2639.6 4512,2649.6 ; 4512,2649.6 cw(c4562,2563) 4527.8,2656.97 ; 4512,2649.6 4527.8,2656.97 ; 4527.8,2656.97 cw(c4562,2563) 4544.64,2661.48 ; 4527.8,2656.97 4544.64,2661.48 ; 4544.64,2661.48 cw(c4562,2563) 4562,2663 ; 4544.64,2661.48 4562,2663 ; 4562,2663 5232.32,2663 ; 5232.32,2663 ccw(c5232.32,2686) 5236.32,2663.35 ; 5232.32,2663 5236.32,2663.35 ; 5236.32,2663.35 ccw(c5232.32,2686) v1@5254.97,2682.01 ; v1@5254.97,2682.01 ccw(c5232.32,2686) v1(5255.32,2686) ; v1@5254.97,2682.01 v1@5255.02,2682.53 ; v1@5255.02,2682.53 ccw(c5235.32,2686) v1(5255.32,2686) ; v1@5255.02,2682.53 v1(5255.32,2686)
  Bottom Layer w30: v1@2433,4168 2554,4168 2797,4411 3359,4411 cw(c3359,4384) 3386,4384 3386,3974.68 cw(c3353.32,3974.68) 3353.32,3942 3318.17,3942 ccw(c3318.17,3915.83) 3292,3915.83 3292,3576.82 cw(c3260,3591) 3260,3556 3105,3556 ccw(c3105,3525) 3074,3525 3074,3415 ; v1(3323,3184) 3323.28,3184 3323.28,3091 3323.28,2998.79 3391.79,2930.28 3928.79,2930.28 3960.28,2898.79 3960.28,2401.72 v1(3993,2369)
  other v1: 3069,3342
12V: C3Z.1 C4Z.2 C37.1 C38.2 J7.1 P16.1 SB11.2 SB11x.2 SB12.2 SB13.2 U10.5 | length 442.8
  Top Layer w20: v1@2761,2284 2762,2283 v1(2802,2283) ; v1@2766,2329 2768,2327 v1@2802,2327 ; v1(3008,2891) v1@3008,2895
  Bottom Layer w20: v1(2802,2283) v1@2802,2327 ; v1(3008,2891) v1(3042,2891) ; C3Z.1@3541,2832 3610,2832 3624,2818 3624,2669 3615,2660 SB12.2@3583,2660
  other v1: 2761,2283 2761,2329 2802,2329
!RXD: C7.1 Q8.1 RS1.2 U6.68 | length 478.6
  Top Layer w20: v1@3476,3401 v1(3476,3400) 3476.25,3399.75 U6.68@3476.25,3332
  Bottom Layer w20: RS1.2@3476.75,3365.5 RS1.2@3477,3365.5 ; C7.1@3527,3365.5 C7.1@3526.5,3365.5 RS1.2@3477,3365.5 ; Q8.1@3665.18,3500.6 3665.18,3511.82 ccw(c3647,3511.82) 3650.16,3529.72 ccw(c3647,3511.82) 3647,3530 3512,3530 3505.92,3529.47 ccw(c3512,3495) 3477.53,3501.08 ccw(c3512,3495) 3477,3495 RS1.2@3477,3365.5
!TXD: C8.1 Q8.4 RS3.2 U6.67 | length 644.2
  Top Layer w12: v1(3425,3400) 3442.22,3417.22 cw(c3461,3398.44) 3461,3425 3523.1,3425 cw(c3523.1,3401.1) 3528.67,3424.34 ; 3524,3425 cw(c3524,3408.1) 3528.67,3424.34 ; v1(3556,3400) 3535.95,3420.05 ccw(c3524,3408.1) 3528.67,3424.34
  Top Layer w20: v1(3425,3400) 3425,3399 3425.07,3398.93 U6.67@3425.07,3332
  Bottom Layer w12: v1(3556,3400) 3577,3379 C8.1@3577,3365.5 C8.1@3577,3364
  Bottom Layer w20: RS3.2@3426,3365.5 3426,3535.8 3426.53,3541.88 cw(c3461,3535.8) 3454.92,3570.27 cw(c3461,3535.8) 3461,3570.8 Q8.4@3612.59,3570.8
#U_CLK: C35.1 U6.16 U8.6 | length 452.9
  Top Layer w12: U6.16@3925.07,4286.72 4024.72,4286.72 v1(4024.45,4287) ; U8.6@4170,4362.79 v1@4170,4402 ; v1@4170,4403 4184,4417 C35.1@4230,4417
  Bottom Layer w12: v1(4024.45,4287) 4149,4287 4169,4307 v1(4169,4402)
#U_DATA: C33.1 R20.2 U6.15 U8.3 | length 507.9
  Top Layer w12: U6.15@3925.07,4235.54 4025.54,4235.54 v1(4027,4237) ; v1@4167,4123 4180,4110 C33.1@4230,4110 ; v1(4169,4123) U8.3@4169,4162 ; R20.2@4230.5,4060 4230.5,4107.5 C33.1@4232,4109
  Bottom Layer w12: v1(4027,4237) 4156,4237 4168,4225 4168,4124 v1(4169,4123)
#U_GND: C32.2 C33.2 C34.2 C35.2 U6.10 U8.1 | length 1500.1
  Top Layer w20: U6.10@3925.07,3979.64 U6.10@3964,3979.64 ; U6.10@3964,3980 3995,3980 4030,3945 4262,3945 4318,4001 4318,4093 4301,4110 4267,4110 C35.2@4267,4417 4267,4488 4249,4506 4072,4506 4056,4490 C32.2@4056,4453.5 ; U8.1@4070,4162 4070,4141 v1(4090,4121) 4090,4097.82 4195,3992.82 4195,3963 4178,3946 4174,3946 ; C34.2@4265,4470 C34.2@4265.75,4469.25
#U_RST: C34.1 U6.17 U8.7 | length 489.2
  Top Layer w12: U6.17@3925.07,4337.91 v1(4023.09,4337.91) ; U8.7@4120,4362.79 v1(4120,4437) 4120,4449 4138,4467 C34.1@4228,4467
  Bottom Layer w12: v1(4023.09,4337.91) 4108.91,4337.91 4120,4349 v1(4120,4437)
#U_VDD: C32.1 R20.1 U6.14 U8.8 | length 736.7
  Top Layer w20: U6.14@3925.07,4184.36 v1(4025.36,4184.36) ; v1(4019,4378) 4043,4378 ; v1(4129,4121) 4129,4097 4211,4015 4254,4015 4267.5,4028.5 R20.1@4267.5,4060
  Bottom Layer w20: v1(4019,4378) 3991,4350 3991,4214 4020.64,4184.36 v1(4025.36,4184.36) ; v1@4025,4185 4112,4185 4128,4169 v1@4128,4122
#X1_: C16.2 U5.1 X1.2 | length 247.5
  Top Layer w10: v1(4202.98,3892.02) cw(c4202.98,3893) 4202,3893 4255,3893 4255,3864.06 ccw(c4267.32,3864.06) 4267.32,3851.74 U5.1@4361,3851.74
  Bottom Layer w10: v1(4202.98,3892.02) C16.2@4254,3892.02
#X2_: C17.2 U5.2 X1.1 | length 242.5
  Top Layer w10: v1(4200,3803) 4200,3802.79 X1.1@4255,3802.79 4255,3823.49 cw(c4263.57,3823.49) 4263.57,3832.06 U5.2@4361,3832.06
  Bottom Layer w10: v1(4200,3803) ccw(c4202.98,3803) 4202.98,3800.02 C17.2@4254,3800.02
\S\D\: P1.1 RR1.1 U1.6 | length 324.8
  Top Layer w12: RR1.1@5104,2547 5087,2547 ccw(c5087,2537) 5077,2537 5077,2448 ccw(c5087.8,2448) 5087.8,2437.2 U1.6@5135.46,2437.2 5216,2437.2 ccw(c5216,2453.2) 5232,2453.2 P1.1@5232,2486
ANT_M: J1.1 U6.49 | length 146.6
  Top Layer w30: J1.1@2554,3652 2699,3652 ccw(c2699,3653) U6.49@2700,3653
B_IN1: U5.24 U10.3 | length 2449.9
  Top Layer w12: v1@4634.62,3308.62 v1(4634.62,3310.38) U5.24@4634.62,3578.12
  Top Layer w25: U10.3@2846,2642.19 2846,2686.38 2924,2764.38 2924,2916.25 2978.75,2971 3841,2971 v1(3875,3005)
  Bottom Layer w12: v1@4633,3312 v1(4634.62,3310.38)
  Bottom Layer w20: v1(3875,3005) 3875,3005.74 3899.07,3029.81 3959.81,3029.81 4238,3308 v1@4633,3308
B_IN2: U5.27 U10.2 | length 2844.6
  Top Layer w12: U5.27@4686,3674 4687,3675 v1(4743,3675)
  Top Layer w25: U10.2@2896,2642.19 2896,2691.13 2956,2751.13 2956,2903 2992,2939 3866,2939 3911,2984 v1(3911,3001)
  Bottom Layer w20: v1(3911,3001) 3976,3001 4256,3281 4755.28,3281 4856.5,3382.22 4856.5,3651.5 4833,3675 v1(4743,3675)
BOOT: CF7.2 DF1.1 L2.1 UF5.8
CC_: RF2.2 UF1.7 | length 61.8
  Top Layer w25: UF1.7@4595.3,3006 cw(c4596.3,3006) 4596.3,3007 RF2.2@4656.56,3007
CHG: LED2.1 UF1.5 | length 62
  Top Layer w25: UF1.5@4595.3,2906 LED2.1@4657.3,2906
CHG_IN: C6.1 J2.1 RF1.2 RF3.2 UF1.3 UF1.8 | length 671.6
  Top Layer w25: UF1.3@4382.7,2956 4470,2956 ; RF3.2@4404.5,2796 4469.67,2796 ; UF1.8@4595.3,3056 4508.59,3056 ccw(c4508.59,3034.41) 4487.33,3038.16 ; v1(4649,3130) RF1.2@4600,3130 ; 4469.67,2796 ccw(c4469.67,2813.33) 4472.68,2796.26 ; 4469.67,2796 4472.68,2796.26 ; 4470,2956 ccw(c4470,2973) 4472.95,2956.26 ; 4470,2956 4472.95,2956.26 ; 4472.68,2796.26 ccw(c4469.67,2813.33) 4486.74,2810.32 ; 4472.95,2956.26 ccw(c4470,2973) 4486.74,2970.05 ; 4486.74,2810.32 ccw(c4469.67,2813.33) 4487,2813.33 ; 4486.74,2810.32 4487,2813.33 ; 4486.74,2970.05 ccw(c4470,2973) 4487,2973 ; 4486.74,2970.05 4487,2973 ; 4487,2813.33 4487,2973 ; 4487,2973 4487,3034.41 ; 4487,3034.41 cw(c4508.59,3034.41) 4487.33,3038.16 ; 4487,3034.41 4487.33,3038.16 ; RF1.2@4598.03,3128.35 ccw(c4600,3128) RF1.2@4598,3128 RF1.2@4598.03,3128.35 ; RF1.2@4598.03,3128.35 cw(c4600,3128) RF1.2@4599.65,3129.97 ; RF1.2@4599.65,3129.97 cw(c4600,3128) RF1.2@4600,3130 ; RF1.2@4599.65,3129.97 RF1.2@4600,3130
  Bottom Layer w25: v1(4649,3130) C6.1@4600,3130 ; C6.1@4598.03,3128.35 ccw(c4600,3128) C6.1@4598,3128 C6.1@4598.03,3128.35 ; C6.1@4598.03,3128.35 cw(c4600,3128) C6.1@4598.12,3128.68 ; C6.1@4598.03,3128.35 C6.1@4598.12,3128.68 ; C6.1@4598.12,3128.68 cw(c4600,3128) C6.1@4598.27,3129 ; C6.1@4598.12,3128.68 C6.1@4598.27,3129 ; C6.1@4598.27,3129 cw(c4600,3128) C6.1@4598.47,3129.29 ; C6.1@4598.27,3129 C6.1@4598.47,3129.29 ; C6.1@4598.47,3129.29 cw(c4600,3128) C6.1@4598.71,3129.53 ; C6.1@4598.71,3129.53 cw(c4600,3128) C6.1@4599,3129.73 ; C6.1@4598.71,3129.53 C6.1@4599,3129.73 ; C6.1@4599,3129.73 cw(c4600,3128) C6.1@4599.32,3129.88 ; C6.1@4599,3129.73 C6.1@4599.32,3129.88 ; C6.1@4599.32,3129.88 cw(c4600,3128) C6.1@4599.65,3129.97 ; C6.1@4599.32,3129.88 C6.1@4599.65,3129.97 ; C6.1@4599.65,3129.97 cw(c4600,3128) C6.1@4600,3130 ; C6.1@4599.65,3129.97 C6.1@4600,3130
  other v1: 2657,2824 2685,2824 2657,2870 2685,2870
COIN_VBAT: J6.1 P13.1 U11.3 | length 785.3
  Top Layer w25: U11.3@4046,2257 U11.3@4046,2257.4 v1(4046,2311)
  Bottom Layer w25: v1(3822,2864) 3823.96,2864 J6.1@3893,2794.96 ccw(c3893,2750.96) 3849,2750.96 3849,2438 3976,2311 v1(4046,2311)
D+: J3.3 RF23.2 RF24.2 U2.2 | length 322.3
  Top Layer w10: U2.2@5140,4369 J3.3@5219.69,4369
  Top Layer w12: J3.3@5212,4368.82 5254.32,4368.82 ccw(c5254.32,4379.68) v1(5262,4372)
  Bottom Layer w12: RF24.2@5124,4386 ccw(c5157.8,4419.8) 5157.8,4372 v1(5262,4372) ; RF24.2@5124.5,4386 RF23.2@5124.5,4436
D-: J3.2 RF21.2 RF22.2 U2.1 | length 320.3
  Top Layer w10: U2.1@5140,4349.31 5160.32,4349.31 cw(c5160.32,4337.74) 5168.5,4345.92 ccw(c5174.57,4351.99) 5174.57,4343.41 J3.2@5219.69,4343.41
  Top Layer w12: J3.2@5212,4343.23 5256.62,4343.23 cw(c5256.62,4335.62) v1(5262,4341) ; v1@5259.03,4343.23 cw(c5259.03,4339.03) v1@5262,4342
  Bottom Layer w12: RF22.2@5125,4287 5125,4333 cw(c5144.31,4313.69) 5144.31,4341 v1(5262,4341)
DBG_RXD: P4.1 U6.11 | length 173.7
  Top Layer w20: U6.11@3925.07,4030.82 4001.18,4030.82 4032,4000 P4.1@4086,4000
DBG_TXD: P5.1 U6.12 | length 104.8
  Top Layer w20: U6.12@3925.07,4082 4027,4082 P5.1@4029,4080
EN_AD: RB1.1 SB_AD.1 U9.4 | length 709.2
  Top Layer w20: U9.4@3481.18,2445.6 RB1.1@3536.4,2445.6 ; RB1.1@3534,2442.5 3534,2424 3545,2413 3669,2413 3729,2473 3729,2824 ; SB_AD.1@3679,2846 3708,2846 3730,2824
EN_ZD: RZ.1 SB_ZD.1 UF2.4 | length 1000.2
  Top Layer w20: v1(3504,2402) 3520,2386 3681,2386 3757,2462 3757,2870 3731,2896 SB_ZD.1@3678,2896
  Bottom Layer w20: UF2.4@3383.74,2506.57 3383.74,2425.26 3406.81,2402.19 3504,2402.19 v1(3504,2402)
FB#: CF17.1 RF16.2 RF31.2 UF2.3 | length 153
  Bottom Layer w20: UF2.3@3383,2605 UF2.3@3383.74,2605 RF16.2@3435,2605 RF31.2@3435,2555 CF17.1@3435,2504
FB_: R21.2 R22.2 U9.3